# Allegro board S32K344MINI_RevC_PCBLayout.brd
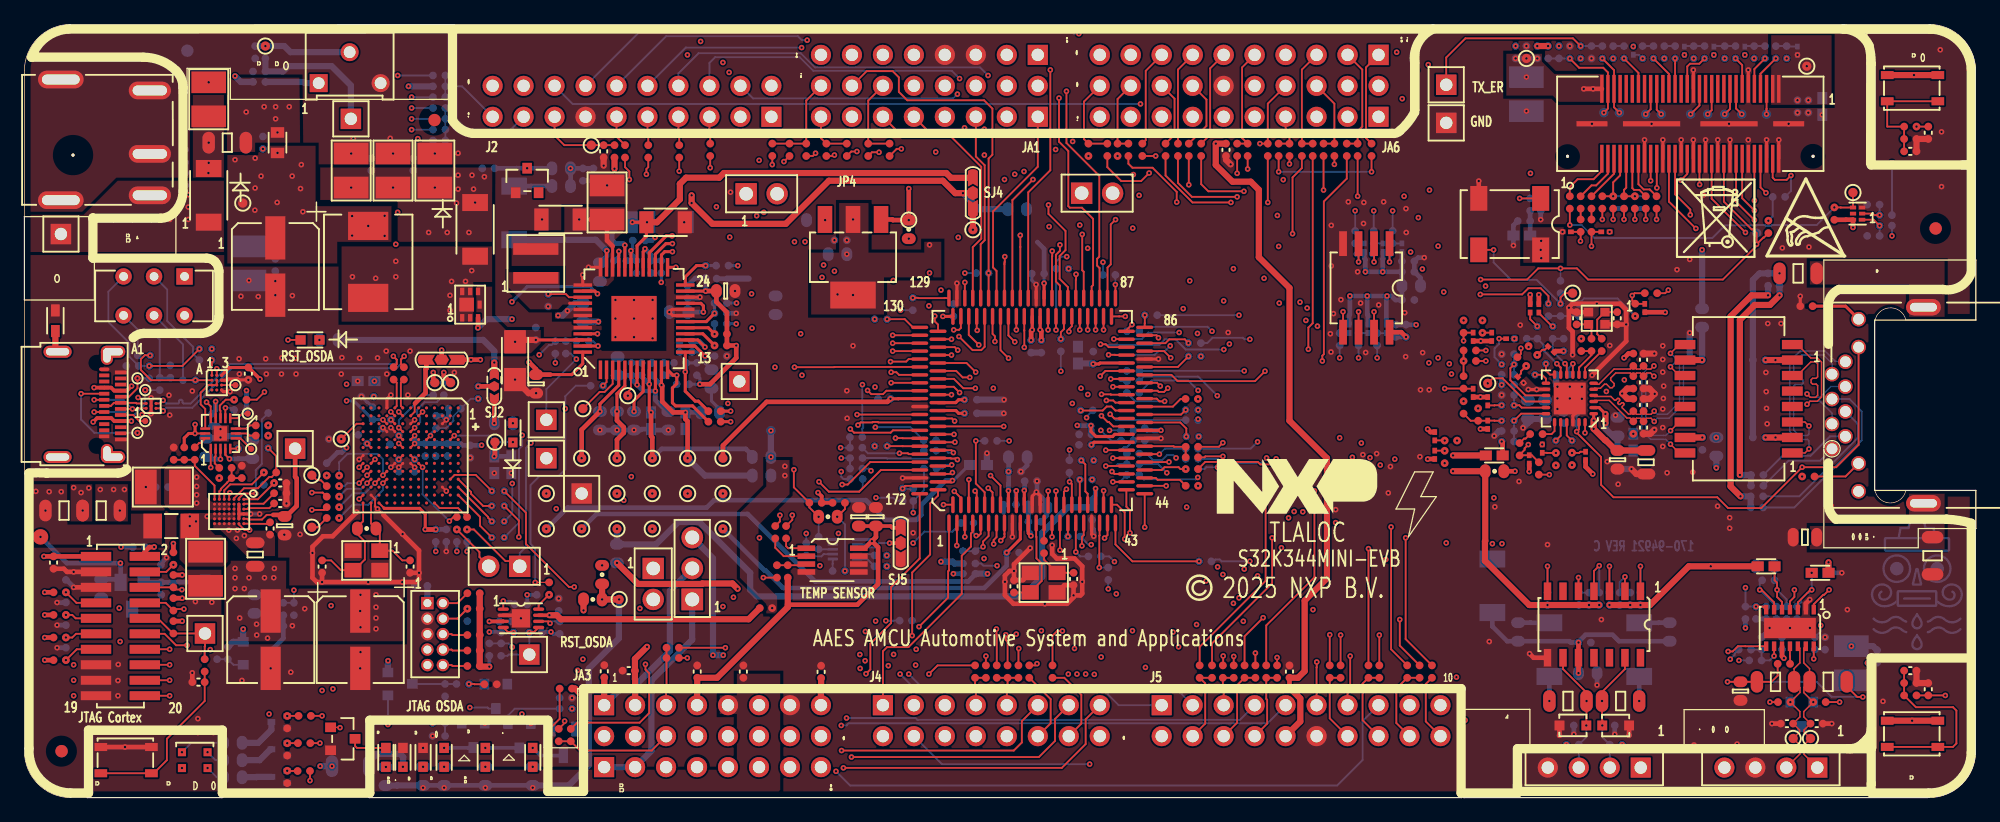
[diagram p0: board, top side]
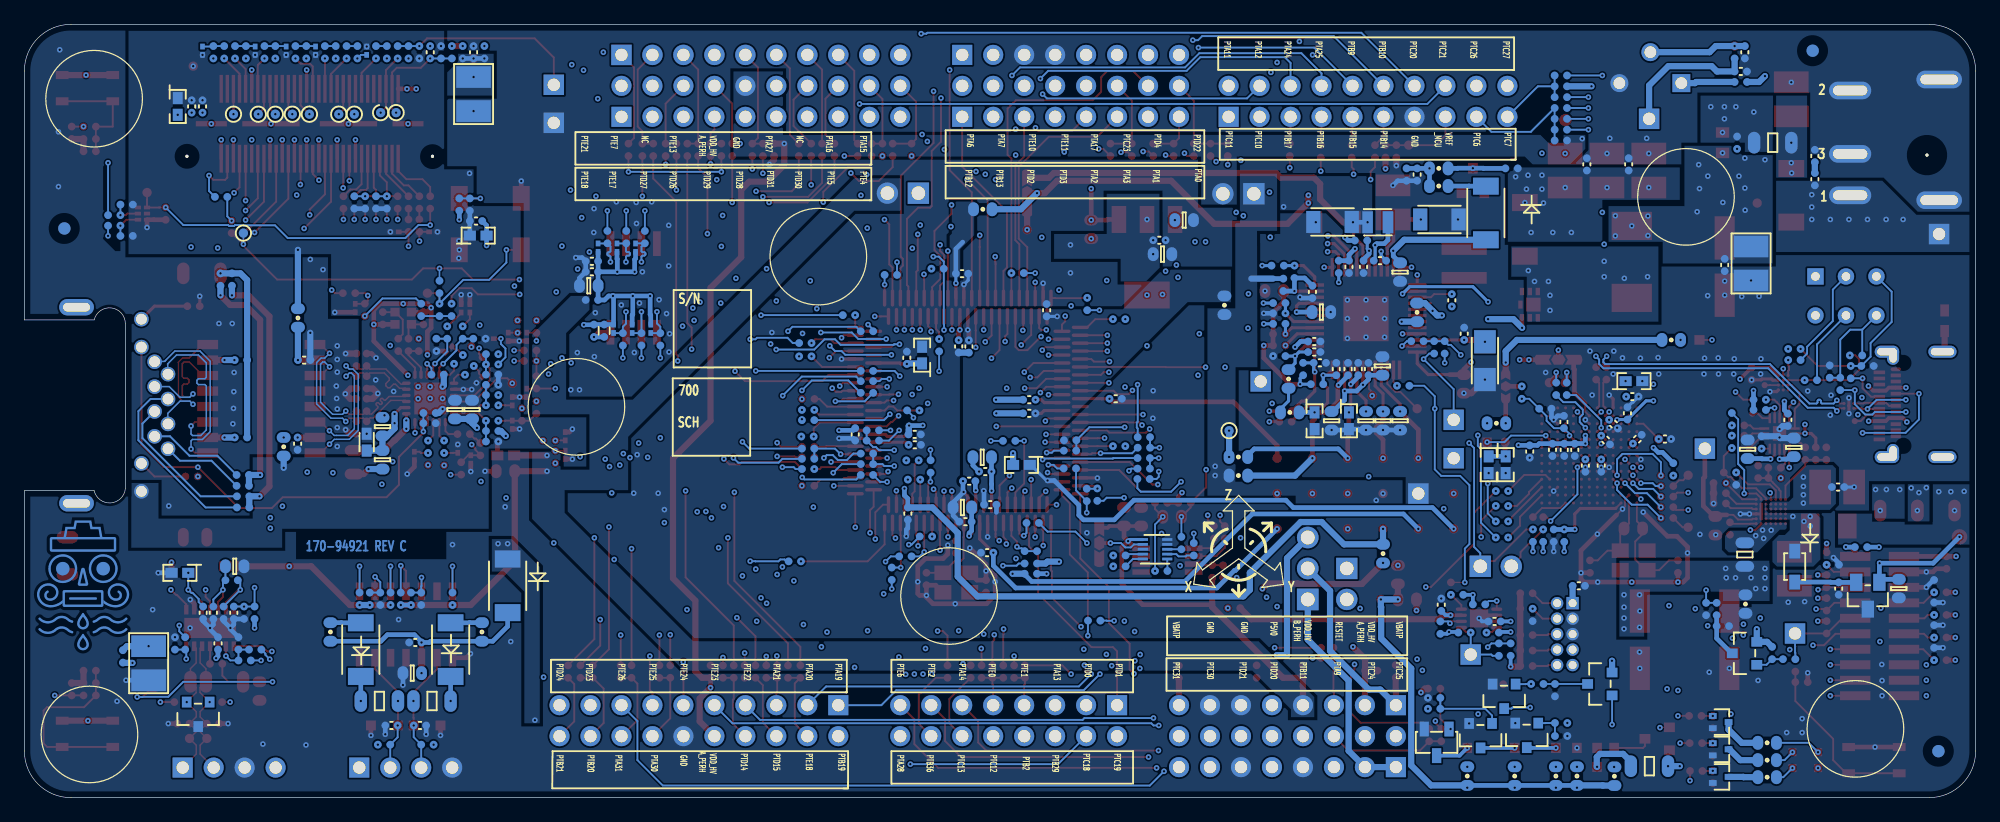
[diagram p1: board, bottom side, seen from below]

Outline 159.99 x 63.42 mm; copper layers: TOP, L2_GND_1, L3_INT_1, L4_INT_2, L5_PWR_1, BOTTOM. Coordinates in mm from the lower left corner of the outline.
Outline path: 0,59.61 0,3.81 arc(1.12,1.12) 3.81,0 156.18,0 arc(158.88,1.12) 159.99,3.81 159.99,25.18 154.28,25.18 arc(152.94,24.17) 151.72,25.33 151.72,38.88 arc(152.86,40.17) 154.28,39.18 159.99,39.18 159.99,59.61 arc(158.88,62.31) 156.18,63.42 3.81,63.42 arc(1.12,62.31) 0,59.61

## Design rules (mm)
constraint set DEFAULT: min track width 0.102
net group DP1_CAN: nets CAN_H_OUT CAN_L_OUT
net group ENET_CON_NC5: nets ENET_CON_NC5 N31272754
net group ENET_CON_RX: nets ENET_CON_RXN ENET_CON_RXP
net group ENET_CON_TX: nets ENET_CON_TXN ENET_CON_TXP
net group ENET_RX: nets ENET_RXN ENET_RXP
net group ENET_TX: nets ENET_TXN ENET_TXP
net group ENETCONN_MII_CRS: nets ENETCONN_MII_CRS PTB22
net group ENETPHY_MII_RMII_RXD1: nets ENETPHY_MII_RMII_RXD1 PTD8
net group ENETPHY_MII_RMII_TXD1: nets EPHY_TXD1 PTB4
net group EPHY_TXD0: nets EPHY_TXD0 PTB5
net group PTA18: nets N31296407 PTA18
net group PTB3: nets N31297052 PTB3
net group PTB15: nets N31295924 PTB15
net group PTB16: nets N31295926 PTB16
net group PTB17: nets N31295928 PTB17
net group PTB20: nets N31297018 PTB20
net group PTC13: nets N31297060 PTC13
net group PTC28: nets N31296974 PTC28
net group PTD26: nets N31295962 PTD26
net group PTE7: nets N31296755 PTE7
net group PTE21: nets N31296516 PTE21
net group SDA_USB_D: nets SDA_USB_DN SDA_USB_DP
net group USB1_D: nets USB1_DN USB1_DP
net group ENETCONN_MII_RMII_RX: nets ENETCONN_MII_RMII_RX_CLK ENETCONN_MII_RMII_RX_DV ENETCONN_MII_RMII_RXD1 ENETCONN_MII_RXD2 ENETCONN_MII_RXD3
net group ENETCONN_MII_RMII_TX: nets ENETCONN_MII_RMII_TX_CLK ENETCONN_MII_RMII_TX_EN ENETCONN_MII_RMII_TXD0 ENETCONN_MII_RMII_TXD1 ENETCONN_MII_TXD2 ENETCONN_MII_TXD3
net group ENETPHY_MII_RMII_RXD0: nets ENETPHY_MII_RMII_RXD0 EPHY_RXD0 PTD9
net group ENETPHY_MII_RMII_TX_CLK: nets N31274490 N31274849 N31275038 PHY_50MHZ PTC0
net group QSPI: nets PTC2 PTC3 PTD7 PTD10 PTD11 PTD12
net group QSPI_MG: nets QSPI_A_CS QSPI_A_IO0 QSPI_A_IO1 QSPI_A_IO2 QSPI_A_IO3 QSPI_A_SCK

## Placement (name value [footprint] x y rotation side)
C1  0.22UF  [CC0402_25]  13.18 50.72 90 bottom
C2  10uF  [CC1210]  18.41 43.82 270 bottom
C3  0.22UF  [CC0402_25]  20.57 43.69 270 bottom
C4  10uF  [CC1210]  33.66 51.44 90 top
C5  10uF  [CC1210]  30.23 51.44 90 top
C6  47uF  [CCE6P8X6P8X8MM]  20.57 43.56 270 top
C7  10uF  [CC1210]  26.8 51.44 90 top
C8  0.22UF  [CC0402_25]  31.88 51.94 90 bottom
C9  0.22UF  [CC0402_25]  13.18 52.63 90 bottom
C10  1UF  [CC0603_OV]  41.96 33.93 270 top
C11  0.22UF  [CC0402_25]  41.94 38.05 90 bottom
C12  1UF  [CC0603_OV]  53.64 39.83 180 bottom
C13  0.22UF  [CC0402_25]  50.19 43.54 270 bottom
C14  1UF  [CC0603_OV]  47.19 43.1 270 bottom
C15  22uF  [CC1206_TOL0P3]  43.97 47.42 180 top
C16  0.22UF  [CC0402_25]  51.38 43.54 270 bottom
C17  22uF  [CC1206_TOL0P3]  43.97 47.42 180 bottom
C18  0.22UF  [CC0402_25]  49.78 35.15 90 bottom
C19  0.047uF  [CC0402_25]  42.95 40.79 270 bottom
C20  1UF  [CC0603_OV]  57.51 41.55 0 top
C21  0.22UF  [CC0402_25]  54.38 41.48 270 bottom
C22  10uF  [CC1210]  47.78 48.82 90 top
C23  0.047uF  [CC0402_25]  48.84 44.04 0 bottom
C24  22uF  [CC1206_TOL0P3]  52.58 47.19 0 top
C25  22uF  [CC1206_TOL0P3]  52.73 47.22 0 bottom
C26  0.22UF  [CC0402_25]  54.23 37.41 180 bottom
C27  0.22UF  [CC0402_25]  53.77 35.66 180 bottom
C28  0.22UF  [CC0402_25]  52.43 35.15 90 bottom
C29  1UF  [CC0603_OV]  48.64 35.41 90 bottom
C30  2.2uF  [CC0603_OV]  47.19 30.91 270 bottom
C31  2.2uF  [CC0603_OV]  48.59 30.91 270 bottom
C32  1UF  [CC0603_OV]  52.81 30.91 270 bottom
C33  10uF  [CC0603]  54.2 30.91 270 bottom
C34  0.22UF  [CC0402_25]  51.46 35.15 90 bottom
C35  10uF  [CC0603]  51.38 30.91 270 bottom
C36  0.22UF  [CC0402_25]  50.62 35.15 90 bottom
C37  2.2uF  [CC0603_OV]  49.99 30.91 270 bottom
C38  0.22UF  [CC0402_25]  54.23 36.55 180 bottom
C39  0.22UF  [CC0402_25]  28.45 51.94 90 bottom
C40  0.22UF  [CC0402_25]  45.8 51.1 270 bottom
C41  1UF  [CC0603_OV]  81.46 27.91 0 bottom
C42  0.22UF  [CC0402_25]  81.2 26.75 0 bottom
C43  10uF  [CC0603]  78.24 27.29 0 bottom
C44  0.22UF  [CC0402_25]  80.8 24.03 180 bottom
C45  0.22UF  [CC0402_25]  77.6 31.52 0 bottom
C46  0.22UF  [CC0402_25]  76.17 39.98 90 bottom
C47  0.22UF  [CC0402_25]  82.55 37.01 270 bottom
C48  0.22UF  [CC0402_25]  81.05 20.09 0 bottom
C49  2.2uF  [CC0603_OV]  83.08 23.8 0 bottom
C50  0.1uF  [CC0402_25]  86.99 29.79 180 bottom
C51  0.1uF  [CC0402_25]  82.83 22.63 0 bottom
C52  0.1uF  [CC0402_25]  77.6 32.64 0 bottom
C53  0.1uF  [CC0402_25]  83.39 37.01 270 bottom
C54  10uF  [CC0603]  86.39 36.3 90 bottom
C55  0.22UF  [CC0402_25]  87.55 23.29 270 bottom
C56  0.22UF  [CC0402_25]  86.99 28.94 180 bottom
C57  0.22UF  [CC0402_25]  87.64 36.08 90 bottom
C58  0.1uF  [CC0402_25]  91.87 29.79 270 bottom
C59  0.1uF  [CC0402_25]  82.52 25.96 0 bottom
C60  0.1uF  [CC0402_25]  70.51 32.72 180 bottom
C61  0.1uF  [CC0402_25]  83.11 42.98 180 bottom
C62  1UF  [CC0603_OV]  66.67 44.58 180 bottom
C63  0.22UF  [CC0402_25]  66.93 45.72 180 bottom
C64  2.2uF  [CC0603_OV]  64.9 47.37 180 bottom
C65  10pF  [CC0402_25]  86.03 17.93 270 top
C66  10pF  [CC0402_25]  81.14 17.33 90 top
C67  4.7uF  [CC1210]  15.11 57.28 90 top
C68  4.7uF  [CC1210]  14.86 18.77 270 top
C69  47uF  [CC1210]  11.35 25.48 180 top
C70  0.1uF  [CC0402_25]  11.28 25.48 180 bottom
C71  0.1uF  [CC0402_25]  20.98 25.81 0 top
C72  0.01UF  [CC0402_25]  20.14 22.07 270 top
C73  1000pF  [CC0402_25]  20.98 24.13 0 top
C74  4.7uF  [CC0603_OV]  21.34 22.3 270 top
C75  2.2uF  [CC0603_OV]  18.69 28.57 270 bottom
C76  4.7uF  [CC0603_OV]  14.91 28.73 90 bottom
C77  0.1uF  [CC0402_25]  15.39 30.99 270 bottom
C78  0.1uF  [CC0402_25]  11.23 17.14 270 bottom
C79  2.2uF  [CC0603_OV]  6.3 17.14 270 bottom
C80  0.1uF  [CC0402_25]  18.36 34.77 270 top
C81  0.22UF  [CC0402_25]  36.56 28.38 270 bottom
C82  0.22UF  [CC0402_25]  29.69 30.63 225 bottom
C83  0.22UF  [CC0402_25]  30.34 29.33 225 bottom
C84  0.22UF  [CC0402_25]  34.7 28.52 270 bottom
C85  0.22UF  [CC0402_25]  32 27.23 270 bottom
C86  0.22UF  [CC0402_25]  28.55 31.52 90 bottom
C87  10uF  [CC0603]  39.93 27.3 270 bottom
C88  10uF  [CC0603]  38.53 27.3 270 bottom
C89  0.22UF  [CC0402_25]  27.74 29.4 135 bottom
C90  0.22UF  [CC0402_25]  32.87 28.52 270 bottom
C91  0.22UF  [CC0402_25]  33.73 28.52 270 bottom
C92  0.22UF  [CC0402_25]  30.7 27.23 270 bottom
C93  10pF  [CC0402_25]  31.62 18.95 270 top
C94  10pF  [CC0402_25]  24.41 18.95 270 top
C95  10uF  [CC0603]  28.02 34.16 180 bottom
C96  0.22UF  [CC0402_25]  28.14 32.89 180 bottom
C97  0.22UF  [CC0402_25]  39.45 14.45 0 bottom
C98  0.22UF  [CC0402_25]  43.82 15.82 90 bottom
C99  0.1uF  [CC0402_25]  25.48 29.41 180 bottom
C100  0.22UF  [CC0402_25]  33.76 30.81 90 bottom
C101  0.22UF  [CC0402_25]  32.54 17.37 180 bottom
C102  1UF  [CC0603_OV]  128.19 10.21 0 bottom
C103  0.22UF  [CC0402_25]  127.94 12.73 0 bottom
C104  100pF  [CC0402_25]  129.9 5.92 0 bottom
C105  100pF  [CC0402_25]  127.56 5.92 180 bottom
C106  10uF  [CC1210]  149.81 11.02 270 bottom
C107  0.22UF  [CC0402_25]  144.12 12.65 90 bottom
C108  1UF  [CC0603_OV]  142.75 18.97 180 bottom
C109  0.22UF  [CC0402_25]  144.5 15.16 270 bottom
C110  10uF  [CC0603]  147.24 18.44 0 bottom
C111  0.22UF  [CC0402_25]  145.34 15.16 270 bottom
C112  4700 PF  [CC0603_OV]  140.72 8.74 270 top
C113  100pF  [CC0402_25]  146.96 6.07 0 top
C114  100pF  [CC0402_25]  144.53 6.07 180 top
C115  0.22UF  [CC0402_25]  142.82 15.16 270 bottom
C116  1000pF  [CC1206_OV]  145.44 43 0 top
C117  15pF  [CC0402_25]  132.77 35.92 90 top
C118  15pF  [CC0402_25]  132.77 34.06 270 top
C119  15pF  [CC0402_25]  132.77 32.21 90 top
C120  15pF  [CC0402_25]  132.77 30.35 270 top
C121  0.1uF  [CC0402_25]  137.06 35.89 180 bottom
C122  0.1uF  [CC0603_OV]  130.63 27.71 270 top
C123  2.2uF  [CC0805_OV]  132.97 27.51 270 top
C124  0.1uF  [CC0603_OV]  130.63 30.43 90 bottom
C125  22uF  [CC0603_OV]  130.63 27.71 270 bottom
C126  0.1uF  [CC0603_OV]  124.69 31.83 270 bottom
C127  22uF  [CC0603_OV]  123.29 31.83 270 bottom
C128  1000pF  [CC1206_OV]  156.46 19.84 270 top
C129  22pF  [CC0402_25]  130.61 39.32 270 top
C130  22pF  [CC0402_25]  127.28 39.32 90 top
C131  10uF  [CC0603]  122.78 46.1 180 bottom
C132  0.22UF  [CC0402_25]  122.96 47.29 180 bottom
C133  10uF  [CC0603]  147.42 56.69 270 bottom
C134  0.22UF  [CC0402_25]  146.28 56.69 270 bottom
C135  0.22UF  [CC0402_25]  145.39 56.69 270 bottom
C136  10uF  [CC1210]  123.16 57.71 270 bottom
C137  0.22UF  [CC0402_25]  126.72 61.14 90 bottom
C138  0.22UF  [CC0402_25]  123.16 61.14 90 bottom
C140  1UF  [CC0603_OV]  113.72 41.99 0 bottom
C141  0.22UF  [CC0402_25]  113.46 43.13 0 bottom
C142  0.22UF  [CC0402_25]  113.46 43.99 0 bottom
C143  0.22UF  [CC0402_25]  154.64 53.01 0 top
C144  0.22UF  [CC0402_25]  156.11 54.53 270 top
C145  0.22UF  [CC0402_25]  2.39 19.28 270 top
C146  0.22UF  [CC0402_25]  154.64 10.41 0 top
C147  0.22UF  [CC0402_25]  156.11 8.89 90 top
C148  1000pF  [CC0402_25]  14.27 9.47 180 top
C149  0.22UF  [CC0402_25]  18.92 61.14 270 bottom
C150  0.22UF  [CC0402_25]  98.53 53.14 270 top
C151  0.22UF  [CC0402_25]  47.5 53.01 270 top
C152  0.22UF  [CC0402_25]  58.95 10.34 90 top
C153  0.22UF  [CC0402_25]  55.17 10.34 90 top
C154  0.22UF  [CC0402_25]  47.55 10.36 90 top
C155  0.22UF  [CC0402_25]  49.56 10.41 180 top
C156  0.1uF  [CC0402_25]  65.33 10.31 90 top
C157  0.22UF  [CC0402_25]  103.73 10.34 90 top
C158  0.22UF  [CC0402_25]  19.25 59.56 180 bottom
C159  1UF  [CC0603_OV]  69.82 23.04 90 top
C160  0.1uF  [CC0603_OV]  68.43 23.04 90 top
C161  100uF  [CCE6P8X6P8]  20.19 12.95 270 top
C162  100uF  [CCE6P8X6P8]  27.53 12.95 270 top
C163  0.1uF  [CC0402_25]  137.59 29.03 270 bottom
D1  PMEG4050EP  [SOD-128]  15.11 49.4 90 top
D2  PMEG4050EP  [SOD-128]  36.96 46.61 90 top
D3  BLUE LED  [LED_0603]  31.04 3.3 90 top
D4  BLUE LED  [LED_0603]  32.69 3.3 90 top
D5  BLUE LED  [LED_0603]  34.42 3.3 90 top
D6  BLUE LED  [LED_0603]  41.68 3.3 90 top
D7  BZX84-A7V5  [SOT23_A]  41.22 50.62 0 top
D8  BAT54HT1  [SOD323]  14.83 18.95 180 bottom
D9  LED ORANGE  [LED_0603_H020]  40.06 29.93 270 top
D10  LED RED  [LED_0603]  23.42 37.54 180 top
D11  PMEG4050EP  [SOD-128]  120.37 17.37 270 bottom
D12  PMEG4050EP  [SOD-128]  132.41 12.14 270 bottom
D13  PMEG4050EP  [SOD-128]  125.04 12.14 270 bottom
D14  PESD1IVN27-AX  [SOD323_BID]  130.48 5.92 0 top
D15  PESD1IVN27-AX  [SOD323_BID]  126.97 5.92 180 top
D16  RGB  [LED4_2P7X2P6_SM]  13.97 3.07 0 top
D17  LED RED  [LED_0603]  29.64 3.3 90 top
D18  BLUE LED  [LED_0603]  37.8 3.3 90 top
D20  PMEG6045ETP  [SOD-128]  40.16 47.96 90 bottom
F1  MFU0603FF04000P500  [FUSE_1P6X0P8_22H]  20.75 53.72 270 top
F2  MFU1206FF06300P500  [FUSE_3P2X1P6]  12.04 22.28 0 top
J2  CON 2x10  [CON_SKT2X10_TH]  61.25 55.84 270 top
J4  CON 2x8  [CON_2X8_SKT_100_TH]  70.4 7.58 0 top
J5  CON 2x10  [CON_SKT2X10_TH]  93.26 7.58 90 top
J7  RJ45X2_LEDYG  [CON12P_1P02_16P48X15P5_RA_TH]  149.32 35.75 90 top
J8  CON 2X30 SKT  [CON_60S_QSH_SM_A]  136.6 55.27 180 top
J9  HDR 2X10 SMT  [HDR_2X10_13P0X3P5_SMT]  7.87 14.07 270 top
J10  CON PWR 3  [CON3_PWR_JACK_TH_PJ051A]  10.29 49.4 0 top
J11  USB_TYPE_C  [CON_TYPE-C_20MIL_RA_LDI]  4.05 32.26 270 top
J12  HDR1X2  [HDR1X2_5P48X2P69]  40.61 18.97 180 top
J13  HDR 2X5  [HDR205_50_TH_172H]  33.05 15.95 270 top
J14  CON_1X4  [CON_SKT1X4_TH_346H]  132.54 2.46 270 top
J15  CON_1X4  [CON_SKT1X4_TH_346H]  147.02 2.46 270 top
JA1  CON 2x8  [CON_2X8_SKT_100_TH]  83.1 55.84 180 top
JA3  CON 2x8  [CON_2X8_SKT_100_TH]  47.54 7.58 0 top
JA6  CON 2x10  [CON_SKT2X10_TH]  111.04 55.84 270 top
JB1  CON_1X8  [CON_SKT1X8_TH_380H]  83.1 60.92 270 top
JB3  CON_1X8  [CON_SKT1X8_TH_380H]  47.54 2.5 90 top
JB6  CON_1X10  [CON1X10_2P54MM_TH]  111.04 60.92 180 top
JP1  HDR 1X3  [HDR103_A]  54.76 16.26 180 top
JP4  HDR1X2  [HDR1X2_5P48X2P69]  59.18 49.53 0 top
JP5  HDR1X2  [HDR1X2_5P48X2P69]  86.69 49.58 0 top
JP11  HDR1X2  [HDR1X2_5P48X2P69]  51.56 18.8 270 top
L1  4.7uH  [IND2_7P4X6P9_SM]  28.19 43.94 270 top
L2  8.2uH  [IND2_XAL40]  41.94 43.82 90 top
L3  1.0uH  [IND_2016A]  49.02 47.19 0 bottom
L4  300Ohms@100MHz  [IND_1P8X1MM_SM]  2.54 39.12 90 top
L5  30 OHM  [IND_0402]  112.45 38.29 90 bottom
L6  BLM18KG121TZ1  [IND_0603]  147.24 18.44 0 top
L7  BLM18KG121TZ1  [IND_0603]  142.82 18.97 180 top
L8  470 Ohm  [IND_0603]  131.93 29.15 90 bottom
L9  120 OHM@100MHz  [IND_0603]  120.52 28.07 0 top
NOREF  -  []  54.33 46.24 90 top
NOREF#2  -  []  15.02 2.42 90 top
NOREF#3  -  []  38.53 33.73 90 top
NOREF#4  -  []  125.47 34.7 0 top
NOREF#5  -  []  6.27 2 0 top
NOREF#6  -  []  73.98 8.93 90 top
NOREF#7  -  []  86.53 62.27 0 top
NOREF#8  -  []  88.18 5.04 90 top
NOREF#9  -  []  5.98 39.25 0 top
NOREF#10  -  []  108.13 38.18 0 top
NOREF#11  -  []  35.9 41.52 0 top
NOREF#12  -  []  144.14 26.19 90 top
NOREF#13  -  []  10.79 31.93 90 top
NOREF#14  -  []  148.22 28.61 0 top
NOREF#15  -  []  108.13 38.18 0 top
NOREF#16  -  []  74.64 39.75 0 top
NOREF#17  -  []  27.17 32.57 90 top
NOREF#18  -  []  45.89 3.7 0 top
NOREF#19  -  []  50.22 14.79 90 top
NOREF#20  -  []  16.88 28.62 90 top
NOREF#21  -  []  5.98 39.25 90 top
NOREF#22  -  []  156.5 0 90 top
NOREF#23  -  []  108.5 60.92 0 top
NOREF#24  -  []  2.72 27.94 0 top
NOREF#25  -  []  51 47.19 0 top
NOREF#26  -  []  108.13 38.18 0 top
NOREF#27  -  []  15.59 22.47 0 top
NOREF#28  -  []  118.3 37.82 90 top
NOREF#29  -  []  12.62 1.82 0 top
NOREF#30  -  []  140.58 1.26 0 top
NOREF#31  -  []  38.07 18.97 0 top
NOREF#32  -  []  77.77 48.33 90 top
NOREF#33  -  []  49.99 39.29 0 top
NOREF#34  -  []  37.6 39.39 0 top
NOREF#35  -  []  31.91 10.05 90 top
NOREF#36  -  []  19.12 20.57 90 top
NOREF#37  -  []  128.26 38.82 90 top
NOREF#38  -  []  15.28 31.12 0 top
NOREF#39  -  []  26.67 61.14 0 top
NOREF#40  -  []  112.8 43.27 0 top
NOREF#41  -  []  63.67 59.73 0 top
NOREF#42  -  []  152.66 -0.57 0 top
NOREF#43  -  []  108.13 38.18 0 top
NOREF#44  -  []  117.72 22.07 0 top
NOREF#45  -  []  118.3 37.82 90 top
NOREF#46  -  []  41.13 37.54 90 top
NOREF#47  -  []  151.72 32.64 0 top
NOREF#48  -  []  17.33 29.47 90 top
NOREF#49  -  []  42.08 14.84 0 top
NOREF#50  -  []  120.55 26.57 0 top
NOREF#51  -  []  24.13 58.6 0 top
NOREF#52  -  []  149.82 47.18 90 top
NOREF#53  -  []  124.76 31.49 90 top
NOREF#54  -  []  6.55 31.13 90 top
NOREF#55  -  []  38.31 44.61 90 top
NOREF#56  -  []  124.66 26.57 90 top
NOREF#57  -  []  40.16 45.76 90 top
NOREF#58  -  []  33.05 10.87 90 top
NOREF#59  -  []  112.8 43.27 0 top
NOREF#60  -  []  39.7 39.39 90 top
NOREF#61  -  []  33.05 14.68 90 top
NOREF#62  -  []  156.9 4.16 90 top
NOREF#63  -  []  57.71 48.19 0 top
NOREF#64  -  []  42.57 46.47 90 top
NOREF#65  -  []  2.54 38.27 90 top
NOREF#66  -  []  45.72 44.57 0 top
NOREF#67  -  []  155.72 24.14 90 top
NOREF#68  -  []  36.27 40.44 90 top
NOREF#69  -  []  29.21 58.6 90 top
NOREF#70  -  []  162.38 25.18 90 top
NOREF#71  -  []  16.46 44.7 90 top
NOREF#72  -  []  0.24 38.22 0 top
NOREF#73  -  []  149.32 35.75 90 top
NOREF#74  -  []  11 31.72 90 top
NOREF#75  -  []  10.42 2 90 top
NOREF#76  -  []  125.47 34.7 0 top
NOREF#77  -  []  90.7 48.24 90 top
NOREF#78  -  []  33.05 15.95 0 top
NOREF#79  -  []  130.96 39.73 0 top
NOREF#80  -  []  6.12 20.57 0 top
NOREF#81  -  []  52.24 35.09 0 top
NOREF#82  -  []  -0.05 27.71 90 top
NOREF#83  -  []  78.02 58.38 0 top
NOREF#84  -  []  152.66 52.39 0 top
NOREF#85  -  []  16.42 33.19 90 top
NOREF#86  -  []  150.4 39.24 90 top
NOREF#87  -  []  149.94 48.4 0 top
NOREF#88  -  []  45.78 42.05 0 top
NOREF#89  -  [unnamed#2]  3.05 3.81 0 top
NOREF#90  -  []  35.9 41.52 0 top
NOREF#91  -  []  39.33 37.54 90 top
NOREF#92  -  []  73.41 24.92 90 top
NOREF#93  -  []  86.53 59.57 90 top
NOREF#94  -  []  47.24 35.09 90 top
NOREF#95  -  []  144.96 28.27 90 top
NOREF#96  -  []  124.76 31.49 90 top
NOREF#97  -  []  8.13 39.55 90 top
NOREF#98  -  []  152.75 57.12 0 top
NOREF#99  -  [unnamed#2]  156.72 46.69 0 top
NOREF#100  -  []  37.2 39.36 90 top
NOREF#101  -  []  -29.16 -186.64 0 top
NOREF#102  -  []  152.66 -0.57 90 top
NOREF#103  -  []  89.14 24.03 90 top
NOREF#104  -  []  96.34 17.2 0 top
NOREF#105  -  []  1.98 1.47 0 top
NOREF#106  -  []  121.72 19.37 90 top
NOREF#107  -  []  2.04 38.22 90 top
NOREF#108  -  []  49.29 -56.3 0 top
NOREF#109  -  []  85.22 48.24 0 top
NOREF#110  -  []  -0.05 27.71 0 top
NOREF#111  -  []  42.39 47.42 0 top
NOREF#112  -  []  108.13 38.18 90 top
NOREF#113  -  []  51.56 16.26 90 top
NOREF#114  -  []  -288.68 -280.68 0 top
NOREF#115  -  []  159.99 25.18 90 top
NOREF#116  -  []  97.79 23.28 0 top
NOREF#117  -  []  149.82 48.63 0 top
NOREF#118  -  [unnamed#2]  33.63 55.58 0 top
NOREF#119  -  []  14.73 31.22 0 top
NOREF#120  -  []  50.08 5.04 0 top
NOREF#121  -  []  45.72 46.47 0 top
NOREF#122  -  []  41.13 37.54 0 top
NOREF#123  -  []  163.85 23.94 90 top
NOREF#124  -  []  31.91 16.78 0 top
NOREF#125  -  []  50.98 44.37 0 top
NOREF#126  -  []  148.22 34.73 0 top
NOREF#127  -  []  49.74 35.09 90 top
NOREF#128  -  []  65.32 5.04 90 top
NOREF#129  -  []  28.19 40.99 90 top
NOREF#130  -  []  42.08 14.84 90 top
NOREF#131  -  []  38.53 32.75 90 top
NOREF#132  -  []  151.72 38.88 90 top
NOREF#133  -  []  136.16 37.16 0 top
NOREF#134  -  []  1.98 -1.73 90 top
NOREF#135  -  []  15.11 47.2 90 top
NOREF#136  -  []  40.23 34.29 90 top
NOREF#137  -  []  15.12 33.19 0 top
NOREF#138  -  []  136.99 39.24 0 top
NOREF#139  -  []  54.19 41.55 90 top
NOREF#140  -  []  152.75 4.16 0 top
NOREF#141  -  []  70.4 5.04 0 top
NOREF#142  -  []  71.86 19.62 90 top
NOREF#143  -  []  18.17 41.57 0 top
NOREF#144  -  []  37.2 39.36 0 top
NOREF#145  -  []  89.46 22.52 90 top
NOREF#146  -  []  39.27 13.96 0 top
NOREF#147  -  []  32.96 35.92 0 top
NOREF#148  -  []  16.48 31.12 0 top
NOREF#149  -  []  15.59 24.07 90 top
NOREF#150  -  []  12.92 3.72 0 top
NOREF#151  -  []  27.77 31.32 90 top
NOREF#152  -  []  17.43 28.52 90 top
NOREF#153  -  []  66.28 19.57 0 top
NOREF#154  -  []  129.98 38.07 0 top
NOREF#155  -  []  11 31.72 90 top
NOREF#156  -  []  23.25 57.43 0 top
NOREF#157  -  []  51.16 47.22 0 top
NOREF#158  -  []  144.96 28.27 90 top
NOREF#159  -  []  24.74 40.24 0 top
NOREF#160  -  []  123.69 10.14 90 top
NOREF#161  -  []  5.87 18.52 90 top
NOREF#162  -  []  66.96 3.7 90 top
NOREF#163  -  []  7.9 29.38 90 top
NOREF#164  -  []  63.19 48.19 90 top
NOREF#165  -  []  129.76 16.84 0 top
NOREF#166  -  []  15.32 -0.68 90 top
NOREF#167  -  []  150.4 27.41 90 top
NOREF#168  -  []  38.81 45.96 0 top
NOREF#169  -  []  50.22 14.79 0 top
NOREF#170  -  []  120.37 15.17 90 top
NOREF#171  -  []  5.87 8.36 0 top
NOREF#172  -  []  132.41 9.94 90 top
NOREF#173  -  []  77.77 49.58 90 top
NOREF#174  -  []  135.51 44.35 0 top
NOREF#175  -  []  148.35 40.42 0 top
NOREF#176  -  []  123.69 14.14 0 top
NOREF#177  -  []  71.86 19.62 90 top
NOREF#178  -  []  37.33 40.44 90 top
NOREF#179  -  []  66.28 20.77 90 top
NOREF#180  -  []  38.31 47.31 0 top
NOREF#181  -  []  23.25 57.43 90 top
NOREF#182  -  []  12.46 44.7 0 top
NOREF#183  -  []  65.32 55.84 90 top
NOREF#184  -  []  40.51 30.78 0 top
NOREF#185  -  []  149.94 47.9 90 top
NOREF#186  -  []  68.75 30 0 top
NOREF#187  -  []  16.17 33.84 90 top
NOREF#188  -  []  0 56.75 0 top
NOREF#189  -  []  42.57 46.47 90 top
NOREF#190  -  []  10.79 31.93 90 top
NOREF#191  -  []  129.98 38.07 90 top
NOREF#192  -  []  86.69 49.58 0 top
NOREF#193  -  []  108.13 38.18 90 top
NOREF#194  -  []  74.91 25.25 90 top
NOREF#195  -  []  15.32 22.2 90 top
NOREF#196  -  []  34.21 35.92 0 top
NOREF#197  -  []  -262.01 240.4 0 top
NOREF#198  -  []  50.83 46.24 0 top
NOREF#199  -  []  59.18 49.53 0 top
NOREF#200  -  []  72.94 5.04 0 top
NOREF#201  -  []  42.39 47.42 0 top
NOREF#202  -  []  133.76 14.14 90 top
NOREF#203  -  []  45.78 36.54 90 top
NOREF#204  -  []  36.96 44.41 90 top
NOREF#205  -  []  76.14 39.47 0 top
NOREF#206  -  []  128.26 39.82 0 top
NOREF#207  -  []  65.32 58.38 0 top
NOREF#208  -  []  41.51 45.96 90 top
NOREF#209  -  []  24.74 40.24 90 top
NOREF#210  -  []  150.4 25.12 90 top
NOREF#211  -  []  47.54 5.04 0 top
NOREF#212  -  []  40.23 34.29 90 top
NOREF#213  -  []  40.06 29.13 90 top
NOREF#214  -  []  156.9 57.12 90 top
NOREF#215  -  []  152.66 52.39 90 top
NOREF#216  -  []  2.72 27.94 90 top
NOREF#217  -  []  63.67 54.5 90 top
NOREF#218  -  []  149.32 35.75 90 top
NOREF#219  -  []  90.64 23.75 90 top
NOREF#220  -  []  66.28 19.37 0 top
NOREF#221  -  []  54.48 46.27 90 top
NOREF#222  -  []  37.53 37.54 0 top
NOREF#223  -  []  66.28 19.37 90 top
NOREF#224  -  []  75.81 40.97 0 top
NOREF#225  -  []  10.63 39.55 0 top
NOREF#226  -  []  30.09 57.43 90 top
NOREF#227  -  []  15.32 22.2 0 top
NOREF#228  -  []  91.86 24.92 90 top
NOREF#229  -  [unnamed#2]  156.72 46.69 180 bottom
NOREF#230  -  [unnamed#2]  13.36 61.26 180 bottom
NOREF#231  -  []  155.19 17.14 180 bottom
NOREF#232  -  [unnamed#2]  3.05 3.81 180 bottom
NOREF#233  -  []  23.15 0.52 180 bottom
Q1  BUK9D23-40EX  [SOT1220]  36.55 40.44 90 top
Q2  BC846B  [SOT23_A]  36.8 5.11 0 bottom
Q3  BSH103  [SOT23]  44.2 4.53 0 bottom
Q5  BCP56-16TX  [SOT223]  67.95 44.32 180 top
Q6  BC857B  [SOT23_A]  30.81 9.32 90 bottom
Q7  BC847B  [SOT23_A]  38.66 8.31 0 bottom
Q8  2SC4738-GR,LF  [SC_75]  20.9 6.2 270 bottom
Q9  2SC4738-GR,LF  [SC_75]  20.9 3.96 270 bottom
Q10  2SC4738-GR,LF  [SC_75]  20.9 1.7 270 bottom
Q11  BC857B  [SOT23_A]  18.95 11.84 90 bottom
Q12  BC847B  [SOT23_A]  26.11 4.83 270 top
Q13  BC846B  [SOT23_A]  40.59 5.08 0 bottom
R1  5.1K  [RC0402_25]  19.56 53.72 270 bottom
R4  0  [RC0402_25]  44.4 36.93 90 bottom
R5  680  [RC0603_OV]  32.69 1.77 90 bottom
R6  0  [RC0402_25]  43.54 36.93 90 bottom
R8  2.0K  [RC1206_OV]  26.75 2.58 0 bottom
R9  680  [RC0603_OV]  34.42 1.77 90 bottom
R10  680  [RC0603_OV]  41.68 1.77 90 bottom
R11  0.1  [RC1206_ERJ-8BW]  40.23 35.84 270 top
R12  0.1  [RC1206_ERJ-8BW]  40.23 35.84 270 bottom
R14  10K  [RC0402_25]  33.99 6.12 0 bottom
R15  215  [RC0402_25]  44.4 8.94 180 top
R16  5.1K  [RC0402_25]  46.94 33.78 0 bottom
R17  0  [RC0402_25]  50.39 45.69 180 bottom
R18  33K  [RC0402_25]  33.99 5.05 180 bottom
R19  5.1K  [RC0402_25]  45.77 37.44 0 bottom
R20  0  [RC0603_OV]  45.8 39.8 270 bottom
R21  220  [RC0402_25]  52.22 43.54 90 bottom
R22  0  [RC0402_25]  56.77 42.06 270 bottom
R23  10K  [RC0402_25]  55.85 43.13 90 bottom
R24  10K  [RC0402_25]  57.1 37.08 180 top
R26  5.1K  [RC0402_25]  57.1 38.02 180 top
R27  10K  [RC0402_25]  55.14 35.15 90 bottom
R28  10K  [RC0402_25]  54 33.91 180 bottom
R29  22K  [RC0402_25]  57.1 39.73 180 bottom
R31  30.9K  [RC0603_OV]  56.24 31.6 0 bottom
R32  300  [RC0603_OV]  56.34 34.34 90 bottom
R33  10K  [RC0402_25]  57.1 36.22 0 bottom
R34  0  [RC0402_25]  57.1 38.86 180 bottom
R35  0  [RC0402_25]  57.1 40.56 180 bottom
R37  0  [RC0402_25]  56.59 31.7 180 top
R38  0  [RC0402_25]  56.59 30.84 180 top
R39  0  [RC0402_25]  57.23 43.64 180 bottom
R40  10K  [RC0402_25]  38.05 51.61 0 bottom
R42  0  [RC0603_OV]  44.02 51.61 0 bottom
R43  0  [RC0603_OV]  44.02 50.16 0 bottom
R44  33K  [RC0402_25]  46.66 51.1 270 bottom
R46  0  [RC0402_25]  77.47 18.36 0 bottom
R47  2.2K  [RC0603_OV]  72.52 46.61 270 top
R48  0  [RC0402_25]  78.55 43.03 180 bottom
R50  0  [RC0402_25]  88.95 42.88 0 bottom
R51  0  [RC0402_25]  72.28 14.52 0 bottom
R52  0  [RC0402_25]  84.99 37.11 90 bottom
R53  0  [RC0402_25]  96.82 19.38 0 bottom
R54  0  [RC0402_25]  85.12 43.38 180 bottom
R55  0  [RC0402_25]  72.85 40.49 270 bottom
R56  0  [RC0402_25]  70.23 39.24 180 bottom
R57  0  [RC0402_25]  90.91 34.16 0 bottom
R58  0  [RC0402_25]  90.91 35 0 bottom
R59  0  [RC0402_25]  88.87 18.36 90 bottom
R60  0  [RC0402_25]  95.96 36.2 0 bottom
R61  0  [RC0402_25]  87.76 19.79 180 bottom
R62  0  [RC0402_25]  85.69 27.17 270 bottom
R63  0  [RC0402_25]  95.73 26.95 180 bottom
R64  0  [RC0402_25]  90.91 27.36 0 bottom
R65  0  [RC0402_25]  95.73 28.63 0 bottom
R66  0  [RC0402_25]  90.42 29.29 180 bottom
R67  0  [RC0402_25]  95.73 27.91 0 top
R68  0  [RC0402_25]  95.73 26.95 180 top
R69  0  [RC0402_25]  90.91 28.22 0 bottom
R70  0  [RC0402_25]  95.73 28.78 0 top
R71  0  [RC0402_25]  95.73 27.79 0 bottom
R72  0  [RC0402_25]  90.42 30.12 180 bottom
R73  0  [RC0402_25]  92.38 39.57 180 bottom
R74  0  [RC0402_25]  70.23 28.83 0 bottom
R75  0  [RC0402_25]  90.91 38.25 180 bottom
R76  0  [RC0402_25]  95.96 37.29 180 bottom
R77  0  [RC0402_25]  79.25 29.26 180 bottom
R78  0  [RC0402_25]  77.32 22.53 0 bottom
R79  0  [RC0402_25]  76.96 19.71 90 bottom
R80  0  [RC0402_25]  83.61 20.56 270 top
R81  0  [RC0402_25]  77.98 19.71 90 bottom
R82  0  [RC0805_OV]  18.92 19.94 270 top
R83  0  [RC0805_OV]  18.92 19.94 270 bottom
R84  0  [RC0402_25]  13.97 28.22 270 top
R85  0  [RC0402_25]  16.48 27.05 0 top
R86  100k  [RC0402_25]  20.98 24.97 180 top
R87  10K  [RC0402_25]  17.7 32.64 180 bottom
R88  100k  [RC0402_25]  19.63 26.16 90 bottom
R89  0  [RC0402_25]  20.14 26.67 180 top
R90  0  [RC0402_25]  17.7 32.64 0 top
R91  0  [RC0402_25]  17.55 29.13 90 bottom
R92  10K  [RC0402_25]  17.7 31.8 180 bottom
R93  0  [RC0402_25]  19.48 30.53 0 top
R94  0  [RC0402_25]  19.48 29.69 0 top
R95  0  [RC0402_25]  19.99 31.04 270 bottom
R96  0  [RC0402_25]  19.99 29.18 90 bottom
R97  10K  [RC0402_25]  24.79 26.92 270 bottom
R98  0  [RC0402_25]  25.3 25.55 180 top
R99  0  [RC0402_25]  25.3 24.69 180 top
R100  0  [RC0402_25]  25.3 23.83 180 top
R101  0  [RC0402_25]  25.3 26.42 180 top
R102  0  [RC0402_25]  25.3 22.94 180 top
R104  1M  [RC0603_OV]  28.07 22.07 0 top
R105  0  [RC0402_25]  68.22 26.14 0 bottom
R106  0  [RC0402_25]  72.02 24.85 90 bottom
R107  0  [RC0402_25]  72.89 24.83 90 bottom
R108  0  [RC0402_25]  74.27 27 0 bottom
R109  0  [RC0402_25]  74.26 28.46 0 bottom
R110  4.7K  [RC0402_25]  33.73 21.49 90 bottom
R111  100k  [RC0402_25]  74.24 29.31 0 bottom
R112  10K  [RC0402_25]  34.59 21.49 270 bottom
R113  0  [RC0402_25]  35.46 22.5 270 top
R114  0  [RC0402_25]  36.3 22.5 270 top
R115  10K  [RC0402_25]  36.3 21.49 90 bottom
R116  0  [RC0402_25]  68.21 27.85 0 bottom
R117  10K  [RC0402_25]  35.46 21.49 90 bottom
R118  0  [RC0402_25]  68.2 28.7 0 bottom
R119  0  [RC0402_25]  68.21 26.99 0 bottom
R120  0  [RC0402_25]  68.2 29.57 0 bottom
R121  0  [RC0402_25]  38.84 21.34 0 bottom
R123  5.1K  [RC0402_25]  8.86 35.41 180 bottom
R124  0  [RC0402_25]  60.81 15.54 180 top
R125  0  [RC0402_25]  38.84 22.66 0 bottom
R126  0  [RC0402_25]  38.84 23.93 0 bottom
R127  0  [RC0402_25]  38.84 25.15 0 bottom
R128  5.1K  [RC0402_25]  11.96 34.95 90 bottom
R129  330  [RC0603_OV]  39.29 30.71 0 bottom
R130  10K  [RC0402_25]  41.91 13.54 180 bottom
R131  10K  [RC0402_25]  39.6 13.54 0 bottom
R132  4.7K  [RC0402_25]  43.89 13.94 90 bottom
R133  10K  [RC0402_25]  40.72 15.85 180 bottom
R134  180K  [RC0402_25]  42.52 16.64 0 bottom
R135  0  [RC0402_25]  43.03 17.14 90 top
R136  5.6K  [RC0402_25]  37.21 33.22 270 bottom
R137  560 OHM  [RC0603_OV]  24.96 37.54 180 bottom
R138  10K  [RC0402_25]  35.28 31.9 180 bottom
R139  0  [RC0402_25]  31.11 34.8 270 top
R140  0  [RC0402_25]  30.28 34.8 270 top
R141  4.7K  [RC0402_25]  38.13 12.14 90 bottom
R142  18K  [RC0402_25]  39.09 12.14 90 bottom
R143  10K  [RC0402_25]  35.94 9.32 0 bottom
R144  100k  [RC0402_25]  34.49 8.81 270 bottom
R145  180K  [RC0402_25]  38.23 9.3 0 top
R147  0  [RC0402_25]  34.39 33.53 90 bottom
R148  0  [RC0402_25]  33.53 33.53 90 bottom
R149  10K  [RC0402_25]  36.83 16.76 180 top
R150  10K  [RC0402_25]  36.83 15.49 180 top
R151  10K  [RC0402_25]  36.83 13.34 180 top
R152  10K  [RC0402_25]  36.83 12.07 180 top
R153  10K  [RC0402_25]  36.83 10.79 180 top
R154  10K  [RC0402_25]  36.32 14.99 270 bottom
R155  0  [RC0402_25]  130.51 4.34 0 bottom
R156  10K  [RC0402_25]  132.51 16.31 90 bottom
R157  10K  [RC0402_25]  129.97 16.31 90 bottom
R158  10K  [RC0402_25]  129.13 16.31 90 bottom
R159  10K  [RC0402_25]  124.89 16.31 90 bottom
R160  10K  [RC0402_25]  131.67 16.31 90 bottom
R161  10K  [RC0402_25]  128.3 16.31 90 bottom
R162  2.0K  [RC1206_OV]  130.89 7.92 180 bottom
R163  2.0K  [RC1206_OV]  130.89 7.92 180 top
R164  2.0K  [RC1206_OV]  126.57 7.92 0 bottom
R165  2.0K  [RC1206_OV]  126.57 7.92 0 top
R166  0  [RC0402_25]  126.95 4.34 180 bottom
R167  10K  [RC0402_25]  130.81 16.31 270 bottom
R168  10K  [RC0402_25]  127.46 16.31 270 bottom
R169  1.0K  [RC0402_25]  151.92 11.58 90 bottom
R170  10K  [RC0402_25]  141.12 15.16 90 bottom
R171  10K  [RC0402_25]  141.94 11.25 0 bottom
R172  10K  [RC0402_25]  146.81 12.65 270 bottom
R173  10K  [RC0402_25]  143 17.83 180 bottom
R174  0  [RC0402_25]  147.19 7.84 0 top
R175  0  [RC0402_25]  144.3 7.84 180 top
R176  60.4  [RC1206_OV]  147.9 9.5 0 top
R177  0  [RC0402_25]  144.27 10.97 180 top
R178  60.4  [RC1206_OV]  143.59 9.5 0 top
R179  10K  [RC0402_25]  141.99 15.16 270 bottom
R180  10K  [RC0402_25]  142.44 12.65 90 bottom
R181  10K  [RC0402_25]  147.65 12.65 90 bottom
R182  10K  [RC0402_25]  143.66 15.16 270 bottom
R183  51K  [RC0201]  131.93 61.26 270 bottom
R184  51K  [RC0201]  121.84 37.64 180 top
R185  51K  [RC0201]  123.47 40.13 270 top
R186  51K  [RC0201]  124.18 40.13 270 top
R187  0  [RC0402_25]  87.05 26.09 0 bottom
R188  49.9  [RC0402_25]  142.06 23.8 180 bottom
R189  0  [RC0402_25]  86.07 21.42 0 bottom
R190  0  [RC0402_25]  90.91 33.2 0 bottom
R191  49.9  [RC0402_25]  131.93 35.92 270 top
R192  49.9  [RC0402_25]  131.93 32.21 270 top
R193  49.9  [RC0402_25]  142.98 42.49 90 bottom
R194  0  [RC0402_25]  133.83 48.82 90 top
R195  49.9  [RC0402_25]  131.93 34.06 90 top
R196  49.9  [RC0402_25]  131.93 30.35 90 top
R197  0  [RC0603_OV]  137.57 39.34 270 bottom
R198  49.9  [RC0402_25]  142.06 24.71 180 bottom
R199  0  [RC0402_25]  132.94 48.82 90 top
R200  0  [RC0402_25]  132.69 61.14 90 bottom
R201  49.9  [RC0402_25]  142.09 26.47 180 bottom
R202  0  [RC0402_25]  134.47 61.14 90 bottom
R203  49.9  [RC0402_25]  143.92 42.49 90 bottom
R204  49.9  [RC0402_25]  142.09 25.58 180 bottom
R205  75  [RC0402_25]  142.24 29.54 180 bottom
R206  51K  [RC0201]  118.8 37.8 90 top
R207  51K  [RC0201]  120.32 37.8 90 top
R208  51K  [RC0201]  125.19 36.77 135 top
R209  51K  [RC0201]  122.68 34.26 135 top
R210  0  [RC0402_25]  95.73 30.96 0 bottom
R211  0  [RC0402_25]  95.73 31.8 0 bottom
R212  0  [RC0402_25]  122.79 35.76 135 top
R213  0  [RC0402_25]  123.7 36.68 135 top
R214  0  [RC0402_25]  119.56 38.63 90 top
R215  0  [RC0402_25]  118.01 38.63 90 top
R216  1.0K  [RC0402_25]  122.68 37.64 0 bottom
R217  1.0K  [RC0402_25]  126.21 37.13 90 bottom
R218  75  [RC0402_25]  142.24 35.89 180 bottom
R219  470  [RC0402_25]  146.28 26.34 180 top
R220  33 OHM  [RC0402_25]  124.05 38.15 90 bottom
R221  51K  [RC0201]  119.99 32.51 270 top
R222  51K  [RC0201]  119.99 30.58 90 top
R223  33 OHM  [RC0402_25]  125.32 38.15 90 bottom
R224  0  [RC0402_25]  87.11 31.76 0 bottom
R225  51K  [RC0201]  118.8 33.2 90 top
R226  470  [RC0402_25]  146.13 40.31 180 top
R227  0  [RC0402_25]  95.72 32.7 0 top
R228  33 OHM  [RC0402_25]  125.58 28.78 90 bottom
R229  33 OHM  [RC0402_25]  126.9 28.78 90 bottom
R230  0  [RC0402_25]  118.01 34.06 90 top
R231  0  [RC0402_25]  118.01 32 90 top
R232  33 OHM  [RC0402_25]  123.51 35.05 315 bottom
R233  0  [RC0402_25]  130.28 61.14 90 bottom
R234  33 OHM  [RC0402_25]  124.4 35.94 315 bottom
R235  1.0M  [RC0805_OV]  146 21.36 180 top
R236  51K  [RC0201]  115.65 29.64 270 top
R237  51K  [RC0201]  115.65 28.12 90 top
R238  51K  [RC0201]  128.02 28.03 90 top
R239  51K  [RC0201]  124.46 28.63 270 top
R240  6.49K  [RC0402_25]  126.11 34.7 180 bottom
R241  0  [RC0402_25]  90.91 26.47 0 bottom
R242  0  [RC0402_25]  95.73 25.58 0 top
R243  33 OHM  [RC0402_25]  121.64 30.91 0 bottom
R244  33 OHM  [RC0402_25]  121.64 32.18 0 bottom
R245  0  [RC0402_25]  125.58 27.76 270 top
R246  0  [RC0402_25]  126.9 27.79 270 top
R247  0  [RC0402_25]  116.46 27.94 270 top
R248  0  [RC0402_25]  128.5 37.13 90 top
R249  0  [RC0402_25]  127.66 37.13 90 top
R250  0  [RC0402_25]  116.97 29.29 0 top
R251  0  [RC0402_25]  129.34 37.13 90 top
R252  51K  [RC0201]  129.64 46.41 180 top
R253  51K  [RC0201]  126.47 46.41 0 top
R254  51K  [RC0201]  123.39 27.74 90 top
R255  51K  [RC0201]  132.87 40.16 90 top
R256  0  [RC0603_OV]  120.55 26.77 0 top
R257  0  [RC0402_25]  95.78 29.62 0 bottom
R258  0  [RC0402_25]  132.08 40.01 270 top
R259  0  [RC0402_25]  87.17 27.66 0 bottom
R260  0  [RC0402_25]  122.61 28.57 90 top
R261  0  [RC0402_25]  125.96 40.01 270 bottom
R262  0  [RC0402_25]  127.61 46.91 90 top
R263  0  [RC0402_25]  127.46 40.01 270 bottom
R264  10K  [RC0402_25]  123.47 48.64 90 bottom
R265  0  [RC0402_25]  128.5 46.91 90 top
R266  0  [RC0402_25]  133.38 41.38 0 top
R267  0  [RC0402_25]  124.97 40.01 270 bottom
R268  10K  [RC0402_25]  124.33 48.64 90 bottom
R269  0  [RC0402_25]  124.18 27 270 top
R270  33 OHM  [RC0402_25]  121.64 35.53 0 bottom
R271  33 OHM  [RC0402_25]  123.98 29.82 0 top
R272  0  [RC0402_25]  118.52 36.68 180 top
R273  0  [RC0402_25]  143.61 61.14 270 bottom
R274  0  [RC0402_25]  142.72 61.14 270 bottom
R275  10K  [RC0402_25]  143.87 49.28 180 bottom
R276  0  [RC0402_25]  140.31 61.14 270 bottom
R277  10K  [RC0402_25]  118.52 35.81 180 top
R278  0  [RC0402_25]  143 46.81 90 top
R279  0  [RC0402_25]  137.77 61.14 270 bottom
R280  0  [RC0402_25]  135.36 61.14 270 bottom
R281  0  [RC0402_25]  133.58 61.14 270 bottom
R282  0  [RC0402_25]  131.17 61.14 270 bottom
R283  0  [RC0402_25]  129.39 61.14 270 bottom
R284  33 OHM  [RC0402_25]  128.5 48.82 270 top
R285  33 OHM  [RC0402_25]  127.61 48.82 270 top
R286  33 OHM  [RC0402_25]  126.72 48.82 270 top
R287  10K  [RC0402_25]  131.17 48.82 270 bottom
R288  0  [RC0402_25]  125.83 61.14 270 bottom
R289  10K  [RC0402_25]  132.94 48.82 270 bottom
R290  10K  [RC0402_25]  124.94 61.14 270 bottom
R291  10K  [RC0402_25]  124.05 61.14 270 bottom
R292  0  [RC0402_25]  122.28 61.14 270 bottom
R293  0  [RC0402_25]  125.96 41.88 270 bottom
R295  10K  [RC0402_25]  127.61 61.14 270 bottom
R296  10K  [RC0402_25]  128.5 61.14 270 bottom
R297  51K  [RC0201]  138.53 61.26 90 bottom
R298  51K  [RC0201]  141.07 61.26 90 bottom
R299  51K  [RC0201]  145.39 61.26 90 bottom
R300  51K  [RC0201]  136.12 61.26 90 bottom
R301  0  [RC0402_25]  136.88 61.14 90 bottom
R302  0  [RC0402_25]  144.5 61.14 90 bottom
R303  0  [RC0402_25]  141.83 61.14 90 bottom
R304  0  [RC0402_25]  139.42 61.14 90 bottom
R305  0  [RC0402_25]  132.05 48.82 90 top
R306  10K  [RC0402_25]  151.61 48.64 0 bottom
R307  10K  [RC0402_25]  151.61 46.08 0 bottom
R308  10K  [RC0402_25]  130.28 48.82 90 bottom
R309  10K  [RC0402_25]  132.05 48.82 90 bottom
R311  0  [RC0402_25]  130.28 48.82 90 top
R313  0  [RC0402_25]  131.17 48.82 90 top
R315  0  [RC0402_25]  129.39 48.82 90 top
R317  0  [RC0402_25]  152.63 46.91 180 bottom
R318  0  [RC0402_25]  152.63 47.78 180 bottom
R319  4.7K  [RC0402_25]  148.41 47.9 90 top
R320  560 OHM  [RC0603_OV]  17.09 1.68 0 bottom
R321  680  [RC0603_OV]  17.09 3.07 0 bottom
R322  680  [RC0603_OV]  17.09 4.5 0 bottom
R323  0  [RC0402_25]  113.46 40.82 180 bottom
R324  0  [RC0402_25]  113.29 38.29 90 bottom
R325  51K  [RC0201]  108.64 38.46 270 bottom
R326  51K  [RC0201]  111.4 45.11 90 bottom
R327  51K  [RC0201]  109.88 45.11 90 bottom
R328  51K  [RC0201]  111.68 38.46 270 bottom
R329  51K  [RC0201]  112.95 45.11 90 bottom
R330  51K  [RC0201]  110.16 38.46 270 bottom
R331  0  [RC0402_25]  109.12 45.97 270 bottom
R332  0  [RC0402_25]  107.85 37.59 90 bottom
R333  10K  [RC0402_25]  22.99 6.71 180 top
R334  0  [RC0402_25]  110.64 45.97 270 bottom
R335  33K  [RC0402_25]  21.55 6.19 270 top
R336  0  [RC0402_25]  110.92 37.59 90 bottom
R337  0  [RC0402_25]  112.19 45.97 270 bottom
R338  10K  [RC0402_25]  22.94 4.47 180 top
R339  0  [RC0402_25]  109.4 37.59 90 bottom
R340  33K  [RC0402_25]  21.55 3.95 270 top
R341  10K  [RC0402_25]  22.91 2.18 180 top
R342  33K  [RC0402_25]  21.55 1.69 270 top
R343  10K  [RC0402_25]  154.64 55.04 0 top
R344  10K  [RC0402_25]  154.64 54.03 0 top
R345  10K  [RC0402_25]  9.4 20.55 0 bottom
R346  10K  [RC0402_25]  12.22 19.61 270 top
R347  10K  [RC0402_25]  12.22 17.75 270 top
R348  10K  [RC0402_25]  12.22 15.85 270 top
R349  10K  [RC0402_25]  12.22 13.97 270 top
R350  0  [RC0402_25]  2.9 16.84 0 top
R351  0  [RC0402_25]  2.9 14.99 0 top
R352  0  [RC0402_25]  2.9 13.13 0 top
R353  0  [RC0402_25]  2.9 11.28 0 top
R354  10K  [RC0402_25]  3.4 15.49 90 bottom
R355  10K  [RC0402_25]  3.4 13.64 90 bottom
R356  10K  [RC0402_25]  154.64 8.38 0 top
R357  10K  [RC0402_25]  3.4 17.35 90 bottom
R358  10K  [RC0402_25]  3.4 11.79 90 bottom
R359  10K  [RC0402_25]  154.64 9.4 0 top
R360  10K  [RC0402_25]  11.71 19.1 180 bottom
R361  560 OHM  [RC0603_OV]  29.62 1.75 90 bottom
R362  4.7K  [RC0402_25]  16.69 11.86 270 bottom
R363  0  [RC0402_25]  19.25 58.7 180 bottom
R364  10  [RC0402_25]  14.78 10.85 90 top
R365  18K  [RC0402_25]  15.29 11.35 0 bottom
R366  10K  [RC0402_25]  21.23 15.47 90 bottom
R367  100k  [RC0402_25]  20.73 14.07 180 bottom
R368  180K  [RC0402_25]  22.1 15.47 270 bottom
R369  1.0K  [RC0402_25]  19.76 61.14 270 bottom
R370  10K  [POT3_3362W]  24.13 58.6 0 top
R371  0  [RC0402_25]  99.44 53.14 270 top
R372  0  [RC0402_25]  105.64 53.14 270 top
R373  0  [RC0402_25]  108.43 53.14 270 top
R375  0  [RC0402_25]  110.46 53.14 270 top
R376  0  [RC0402_25]  109.32 53.14 270 top
R377  0  [RC0402_25]  104.75 53.14 270 top
R378  0  [RC0402_25]  100.3 53.14 270 top
R379  0  [RC0402_25]  96.49 53.14 270 top
R380  0  [RC0402_25]  94.59 53.14 270 top
R381  0  [RC0402_25]  91.67 53.14 270 top
R382  0  [RC0402_25]  69.19 53.14 90 top
R383  0  [RC0402_25]  62.74 53.14 90 top
R384  0  [RC0402_25]  64.11 53.14 90 top
R385  0  [RC0402_25]  61.32 53.14 90 top
R386  0  [RC0402_25]  70.94 53.14 90 top
R387  0  [RC0402_25]  88.8 53.14 270 top
R388  0  [RC0402_25]  90.53 53.14 270 top
R389  0  [RC0402_25]  101.96 53.14 270 top
R390  0  [RC0402_25]  106.53 53.14 270 top
R391  0  [RC0402_25]  87.25 53.14 270 top
R392  0  [RC0402_25]  89.64 53.14 270 top
R393  0  [RC0402_25]  93.57 53.14 270 top
R394  0  [RC0402_25]  95.48 53.14 270 top
R395  0  [RC0402_25]  107.42 53.14 270 top
R396  10K  [RC0402_25]  34.01 53.9 0 bottom
R397  10K  [RC0402_25]  34.01 58.34 0 bottom
R398  0  [RC0402_25]  34.01 59.23 0 bottom
R399  0  [RC0402_25]  34.01 56.57 0 bottom
R400  0  [RC0402_25]  34.01 55.68 0 bottom
R401  0  [RC0402_25]  34.01 57.45 0 bottom
R402  0  [RC0402_25]  102.84 53.14 270 top
R403  0  [RC0402_25]  34.01 54.79 0 bottom
R404  0  [RC0402_25]  48.39 53.01 90 top
R405  0  [RC0402_25]  49.25 53.01 90 top
R406  0  [RC0402_25]  51.16 53.01 90 top
R407  0  [RC0402_25]  53.7 53.01 90 top
R408  0  [RC0402_25]  103.73 53.14 270 top
R409  0  [RC0402_25]  56.24 53.14 90 top
R410  0  [RC0402_25]  65.76 53.14 90 top
R411  0  [RC0402_25]  67.44 53.14 90 top
R412  0  [RC0402_25]  81.51 10.34 270 top
R413  0  [RC0402_25]  80.62 10.34 270 top
R414  0  [RC0402_25]  79.73 10.34 270 top
R415  0  [RC0402_25]  98.27 10.34 90 top
R416  0  [RC0402_25]  99.16 10.34 90 top
R417  0  [RC0402_25]  78.84 10.34 270 top
R418  0  [RC0402_25]  77.95 10.34 270 top
R419  0  [RC0402_25]  53.16 11.46 180 top
R420  0  [RC0402_25]  53.16 12.29 180 top
R421  0  [RC0402_25]  107.92 10.34 90 top
R422  0  [RC0402_25]  111.1 10.34 90 top
R423  0  [RC0402_25]  114.4 10.34 90 top
R424  0  [RC0402_25]  115.42 10.34 90 top
R425  0  [RC0402_25]  113.39 10.34 90 top
R426  0  [RC0402_25]  110.21 10.34 90 top
R427  0  [RC0402_25]  107.04 10.34 90 top
R428  0  [RC0402_25]  101.83 10.34 90 top
R429  0  [RC0402_25]  100.05 10.34 90 top
R430  0  [RC0402_25]  44.81 5.13 270 top
R431  0  [RC0402_25]  97.38 10.34 90 top
R432  0  [RC0402_25]  43.82 5.13 270 top
R433  0  [RC0402_25]  102.72 10.34 90 top
R434  0  [RC0402_25]  100.94 10.34 90 top
R435  0  [RC0402_25]  96.37 10.34 90 top
R436  0  [RC0402_25]  82.4 10.34 270 top
R437  0  [RC0402_25]  84.3 10.34 270 top
R438  0  [RC0402_25]  10.24 34.9 90 bottom
R439  0  [RC0402_25]  11.1 33.93 90 bottom
R440  680  [RC0603_OV]  37.8 1.77 90 bottom
R441  10K  [RC0402_25]  44.4 7.29 180 bottom
R442  33K  [RC0402_25]  44.4 8.18 0 bottom
R443  0  [RC0402_25]  119.2 31.42 270 top
R448  0  [RC0402_25]  14.86 36.8 0 bottom
R449  0  [RC0402_25]  9.8 36.27 0 bottom
R452  0  [RC0402_25]  14.86 35.89 0 bottom
R453  0  [RC0402_25]  13.51 34.24 0 bottom
R454  0  [RC0402_25]  141.07 12.14 0 bottom
R455  100k  [RC0402_25]  16.48 26.21 0 top
R456  100k  [RC0402_25]  13.11 28.22 270 top
R457  100k  [RC0402_25]  17.83 26.72 90 top
R458  100k  [RC0402_25]  12.24 28.22 90 top
R500  0  [RC1206_OV]  16.64 53.72 0 bottom
R501  0  [RC1206_OV]  3.25 23.55 180 top
R502  0  [RC1206_OV]  6.3 23.55 0 top
R516  0  [RC0402_25]  70.21 18.97 180 bottom
R517  0  [RC0402_25]  64.11 20.37 270 bottom
R518  0  [RC0402_25]  70.21 19.86 0 bottom
R519  0  [RC0402_25]  65.13 20.88 90 bottom
R520  0  [RC0402_25]  66.78 18.59 0 bottom
R521  10K  [RC0402_25]  64.87 24.18 180 top
R522  10K  [RC0402_25]  66.78 24.18 0 top
R523  0  [RC0603_OV]  65.89 23.04 0 top
R524  10K  [RC0402_25]  62.6 18.55 90 top
R525  0  [RC0402_25]  61.71 18.55 90 top
R526  0  [RC0402_25]  62.46 21.77 90 top
R527  0  [RC0402_25]  61.57 21.77 90 top
R528  0  [RC0603_OV]  47.37 18.29 90 top
R529  0  [RC0603_OV]  46.61 16.26 0 top
R530  0  [RC0603_OV]  60.45 26.42 180 bottom
R531  0  [RC0603_OV]  60.45 27.94 180 bottom
R532  0  [RC0603_OV]  61.59 40.39 90 bottom
R533  0  [RC0603_OV]  48.59 20.02 90 bottom
R534  0  [RC0603_OV]  81.41 48.26 0 bottom
R535  0  [RC0603_OV]  134.9 13.59 270 bottom
R536  0  [RC0603_OV]  122.48 13.59 270 bottom
R537  10K  [RC0402_25]  121.64 34.7 0 bottom
R538  1.0K  [RC0402_25]  121.64 36.37 180 bottom
R539  10K  [RC0402_25]  121.64 33.86 0 bottom
R540  1.0K  [RC0402_25]  121.64 33.02 180 bottom
R541  10K  [RC0402_25]  126.77 30.71 0 bottom
R542  1.0K  [RC0402_25]  126.77 31.55 180 bottom
R543  10K  [RC0402_25]  121.64 29.21 0 bottom
R544  1.0K  [RC0402_25]  121.64 30.07 180 bottom
R730  47K  [RC0603_OV]  18.87 15.88 270 bottom
R731  0  [RC1206_OV]  16.64 53.72 0 top
R732  0  [RC0603_OV]  138.73 28.78 90 bottom
SJ1  3 PIN 0603 SHORT 1-2  [3PIN_0603_SOLDER_BLOB_JUMPER_SHORT]  34.21 35.92 0 top
SJ2  3 PIN 0402 JUMPER  [3PIN_0402X2_A]  38.53 33.73 270 top
SJ4  3 PIN 0603 SHORT 1-2  [3PIN_0603_SOLDER_BLOB_JUMPER_SHORT]  77.77 49.58 90 top
SJ5  3 PIN 0603 SHORT 1-2  [3PIN_0603_SOLDER_BLOB_JUMPER_SHORT]  71.86 20.88 270 top
SW2  SW SPST NO  [SW4_4P15_4P2X3P2_SM]  154.76 58.19 0 top
SW3  SW SPST NO  [SW4_4P15_4P2X3P2_SM]  154.76 5.23 0 top
SW4  SW SPST NO  [SW4_4P15_4P2X3P2_SM]  8.28 3.07 0 top
SW5  M096H-A020RT21A  [SW6_DPDT_M096H_TH]  13.13 42.75 270 top
T1  PT61018PEL  [XFMR16_1P27_13P05X7P15]  140.56 32.72 90 top
TP8  -  [TPAD_030]  49.48 32.97 90 top
TP9  -  [TPAD_030]  45.8 31.9 180 top
TP15  -  [TPAD_030]  57.28 22.05 0 top
TP16  -  [TPAD_030]  57.28 24.94 270 top
TP17  -  [TPAD_030]  57.28 27.84 0 top
TP18  -  [TPAD_030]  72.52 47.37 0 top
TP19  -  [TPAD_030]  77.77 46.58 0 top
TP20  -  [TPAD_030]  51.49 22.05 90 top
TP21  -  [TPAD_020]  18.31 31.5 90 top
TP22  -  [TPAD_020]  18.59 28.6 90 top
TP23  -  [TPAD_050]  1.32 21.39 90 top
TP24  -  [TPAD_020]  9.27 34.39 90 top
TP25  -  [TPAD_020]  9.91 33.43 90 top
TP26  -  [TPAD_020]  9.91 30.89 0 top
TP27  -  [TPAD_020]  9.27 29.92 90 top
TP28  -  [TPAD_020]  17.3 33.83 90 top
TP29  -  [TPAD_030]  38.58 29.16 270 top
TP44  -  [TPAD_030]  25.98 29.41 0 top
TP58  -  [TPAD_030]  146.46 4.85 0 top
TP59  -  [TPAD_030]  145.03 4.85 0 top
TP63  -  [TPAD_030]  119.99 33.99 0 top
TP65  -  [TPAD_030]  126.95 41.38 0 top
TP67  -  [TPAD_030]  146.15 59.99 180 top
TP68  -  [TPAD_030]  140.82 56.06 180 bottom
TP69  -  [TPAD_030]  139.42 56.06 180 bottom
TP70  -  [TPAD_030]  142.85 56.06 90 bottom
TP71  -  [TPAD_030]  138.02 56.06 270 bottom
TP72  -  [TPAD_030]  136.63 56.06 0 bottom
TP73  -  [TPAD_030]  134.21 56.06 0 bottom
TP74  -  [TPAD_030]  132.94 56.06 0 bottom
TP75  -  [TPAD_030]  130.78 56.18 0 bottom
TP76  -  [TPAD_030]  129.51 56.18 0 bottom
TP77  -  [TPAD_030]  123.16 60.63 180 top
TP78  -  [TPAD_030]  142.04 46.3 180 bottom
TP79  -  [TPAD_030]  149.94 49.63 180 top
TP89  -  [TPAD_030]  19.76 61.65 180 top
TP90  -  [TPAD_030]  46.48 53.52 0 top
TP117  -  [TPAD_030]  34.95 34.04 0 top
TP118  -  [TPAD_030]  33.66 34.04 0 top
TP119  -  [TPAD_030]  51.49 24.94 0 top
TP120  -  [TPAD_030]  45.69 27.84 0 top
TP121  -  [TPAD_030]  48.59 27.84 0 top
TP122  -  [TPAD_030]  54.38 27.84 0 top
TP123  -  [TPAD_030]  51.49 27.84 0 top
TP124  -  [TPAD_030]  48.77 16.26 0 top
TP125  -  [TPAD_030]  48.59 24.94 0 top
TP126  -  [TPAD_030]  61.21 30.1 180 bottom
TP127  -  [TPAD_030]  42.8 24.94 0 top
TP128  -  [TPAD_030]  54.38 24.94 0 top
TP129  -  [TPAD_030]  17.91 48.77 0 top
TP130  -  [TPAD_030]  48.59 22.05 0 top
TP131  -  [TPAD_030]  42.8 22.05 0 top
TP132  -  [TPAD_030]  45.69 22.05 0 top
TP133  -  [TPAD_030]  23.57 26.44 0 top
TP134  -  [TPAD_030]  23.57 22.17 0 top
TPH2  HDR 1X1  [HDR_1X1]  3 46.23 0 top
TPH3  HDR 1X1  [HDR_1X1]  45.69 24.94 0 top
TPH6  HDR 1X1  [HDR_1X1]  26.77 55.68 180 top
TPH7  HDR 1X1  [HDR_1X1]  116.59 58.47 180 top
TPH10  HDR 1X1  [HDR_1X1]  41.4 11.73 0 top
TPH11  HDR 1X1  [HDR_1X1]  58.62 34.14 90 top
TPH12  HDR 1X1  [HDR_1X1]  116.59 55.35 180 top
TPH16  HDR 1X1  [HDR_1X1]  42.8 27.84 0 top
TPH19  HDR 1X1  [HDR_1X1]  14.81 13.46 0 top
TPH23  HDR 1X1  [HDR_1X1]  22.2 28.63 0 top
TPH24  HDR 1X1  [HDR_1X1]  42.8 30.99 0 top
U1  PFS2613AMDGVAD  [LQFP48_EP146MIL]  49.99 39.29 90 top
U2  S32K344EHT1MPBST  [MQFP172_0P65_16X16]  82.64 31.75 90 top
U3  NX20P3483UK  [WLCSP42_0P4_2P94X2P54_SMDP]  16.79 23.47 270 top
U4  PTN5110  [HX2QFN16_0P4_2P7X2P7]  16.08 29.87 90 top
U5  TLV76033DBZR  [SOT-23]  8.84 16.56 0 bottom
U6  PCMF1USB3S  [WLCSP5_0P4_0P82X1P22]  10.39 32.13 90 top
U7  NX20P0407  [WLCSP12_0P4_1P3X1P7MM_SMDP]  15.77 34.04 0 top
U8  MK26FN2M0VMI18  [BGA169_0P65_9X9]  31.67 28.07 270 top
U10  NTS0102TLH  [XSON8_0P5_3P1X2P1_EP]  40.72 14.71 0 top
U11  TJA1022T  [SOIC14_1P27_4X8]  128.7 14.2 270 top
U12  TJA1043TK/1Y  [HVSON14_0P65_4P6X3P1_EP]  144.77 13.92 270 top
U13  PESD2CANFD24L-TR  [SOT23_A]  145.75 6.83 0 bottom
U14  KSZ8091RNDIA-TR  [QFN24_4X4MM_SLUG]  126.72 32.74 90 top
U15  NC7SZ08L6X  [MICROPACK6_0P5_1X1P45]  150.32 47.9 180 top
U16  W25Q64JVSSIQ  [SO8_W]  110.03 41.81 270 top
U17  FXLS8964AF  [DFN10_0P4_2X2MM]  67.28 20.37 180 bottom
U18  P3T1750DP  [TSSOP8_A]  66.27 19.48 0 top
Y1  16MHZ  [XTLOSC4_3P2X2P5MM_SM]  83.58 17.64 180 top
Y2  16MHZ  [XTLOSC4_3P2X2P5MM_SM]  28.04 19.46 180 top
Y3  25MHz  [XTL4_2P1X1P7MM_SM]  128.93 39.32 180 top
Y4  50MHZ  [XTLOSC4_SM]  121.79 47.04 180 top

## Library data of the parts
C1 C3 C8 C9 C11 C13 C16 C18 C21 C26-C28 C34 C36 C38-C42 C44-C48 C55-C57 C62 C63 C96-C98 C100 C103 C107 C109 C111 C115 C132 C134 C135 C137 C138 C140-C147 C149-C155 C157-C159 = CAP_NP: room: ETHERNET RMII/MII 10/100PHY
C2 C4 C5 C7 C15 C17 C19 C22-C25 C30 C31 C33 C35 C37 C43 C49 C54 C64-C69 C72-C76 C79 C81-C92 C95 C101 C106 C110 C116-C120 C122-C131 C133 C136 C148 C160 = CAP_NP
C6 C161 C162 = CAP_POL
C10 C12 C14 C20 C29 C32 C102 C108 = CAP_NP: room: MCU HDRs
C50-C53 C58-C61 C70 C71 C77 C78 C80 C121 C163 = CAP_NP: room: POWER SUPPLY_SW
C93 C94 C104 C105 C113 C114 = CAP_NP: room: OPENSDA MCU
C99 = CAP_NP: tolerance: 10%; room: OPENSDA MCU
C112 = CAP_NP: room: CAN-FD PHY
C156 = CAP_NP: room: ARDUINO HDRS
D1 D2 D8 D11-D13 = DIODE_SCHTKY
D3-D6 D10 D17 D18 = LED
D7 = DIODEZ_SOT23
D9 = LED: room: OPENSDA MCU
D14 D15 = DIODE_BIDIR
D16 = LRTBR48G_4P
D20 = DIODE_SCHTKY: room: LIN PHY
F1 F2 = FUSE
J2 J5 J9 JA6 = CONN_HDR_10X2
J4 JA1 JA3 = CONN_HDR_8X2
J7 = CON_RJ45_1X8_YG
J8 = QSH030
J10 = DC_POWER_JACK_SHD: room: POWER SUPPLY_LR
J11 = USB24_TYPEC
J12 JP4 JP5 JP11 = CONN_HDR_2X1
J13 = CONN_HDR_5X2
J14 J15 = CONN_HDR_4X1
JB1 JB3 = CONN_HDR_8X1
JB6 = CONN_HDR_10X1
JP1 = CONN_HDR_3X1
L1 = INDP
L2-L4 L8 = INDUCTOR
L5 = INDUCTOR_FERRITE: tolerance: 25%
L6 L7 = IND_FERRITE: tolerance: 25%; room: FLEXRAY
L9 = IND_FERRITE
Q1 = BUK6D23-40E_SOT1220_8P
Q2 Q7-Q10 Q12 Q13 = NPN
Q3 = MOSFET_N: room: POWER SUPPLY_SW
Q5 = TRAN_NPN_SOT223
Q6 Q11 = PNP
R1 R4 R6 R11 R12 R16 R17 R19-R22 R26 R29 R31 R32 R34 R35 R37-R39 R42 R43 R46 R47 R50 R51 R59 R61 R62 R77-R79 R82 R83 R123 R128 R136 R155 R166 R174 R175 R183 R185-R196 R199-R201 R203-R208 R212-R215 R218 R221 R222 R224 R225 R227 R230 R231 R233 R235-R240 R245-R248 R250-R256 R259 R260 R262 R265-R267 R269 R272-R274 R276 R278-R286 R288 R292 R293 R297-R305 R311 R313 R315 R318 R323-R332 R334 R336 R337 R339 R350-R353 R364 R401 R403 R404 R438 R439 R443 R448 R449 R452-R454 R500-R502 R516-R520 R523 R525-R536 R730-R732 = RES
R5 R8-R10 R18 R321 R322 R440 R442 = RES: room: POWER SUPPLY_LR
R14 R441 = RES: tolerance: 1%; room: POWER SUPPLY_LR
R15 = RES: room: POWER SUPPLY_SW
R23 R24 R27 R28 R33 R40 R87 R92 R97 R112 R115 R117 R129-R133 R138 R141 R143 R149-R154 R156-R161 R167-R169 R216 R217 R362 R366 R369 R521 R522 R524 R538 R540 R542 R544 = RES: tolerance: 1%; room: OPENSDA MCU
R44 R335 R340 R342 = RES: room: USER PERIPHERALS
R48 R52-R58 R60 R63-R76 R80 R81 R84 R85 R89-R91 R93-R96 R113 R114 R162-R165 R177 R371-R373 R375-R395 R398-R400 R402 R405 R410-R413 R415 R417-R419 R422-R424 R426-R433 R435 R436 = RES: room: LIN PHY
R86 R88 R98-R102 R104-R111 R116 R118-R121 R124-R127 R134 R135 R137 R139 R140 R142 R144 R145 R147 R148 R320 R361 R363 R365 R367 R368 R455-R458 = RES: room: OPENSDA MCU
R170-R173 R179-R182 R345-R349 R354 R355 R357 R358 R360 = RES: tolerance: 1%; room: TWIRPI
R176 R178 = RES: room: CAN-FD PHY
R184 R198 R202 R209 R211 = RES: signal model: RES_RC0402_25_DISCRETE_0.45_MM__0
R197 = RES: signal model: RES_RC0201_DISCRETE_0.26MM_47_1_22
R210 R241 R242 R249 R257 R258 R261 R263 = RES: signal model: DEFAULT_RESISTOR_0.001OHM_1_2
R219 R226 R264 R268 R287 R289 R306-R309 R333 R338 R341 R343 R344 R356 R359 R396 R397 R537 R539 R541 R543 = RES: tolerance: 1%
R220 R223 R234 R243 R244 R270 R271 = RES: room: SAI
R228 R229 R232 = RES: signal model: DEFAULT_RESISTOR_33.000000OHM_1_2; room: SAI
R275 R277 R290 R291 = RES: tolerance: 1%; room: MCU HDRs
